# Altium PCB AirBnB-v1.0.PcbDoc (part 5 of 6)
Units mil, origin at the board's own origin, x right, y up, seen from the top; angles counter-clockwise.
Board outline 3937 x 3937 mil, 4 copper layers (Top Layer, Signal + GND, Signal + 3v3, Bottom Layer), stack 62.417 mil thick; 240 components, 168 nets, 829 pads, 395 vias.
Unrouted connection lines stored in the file: 6.
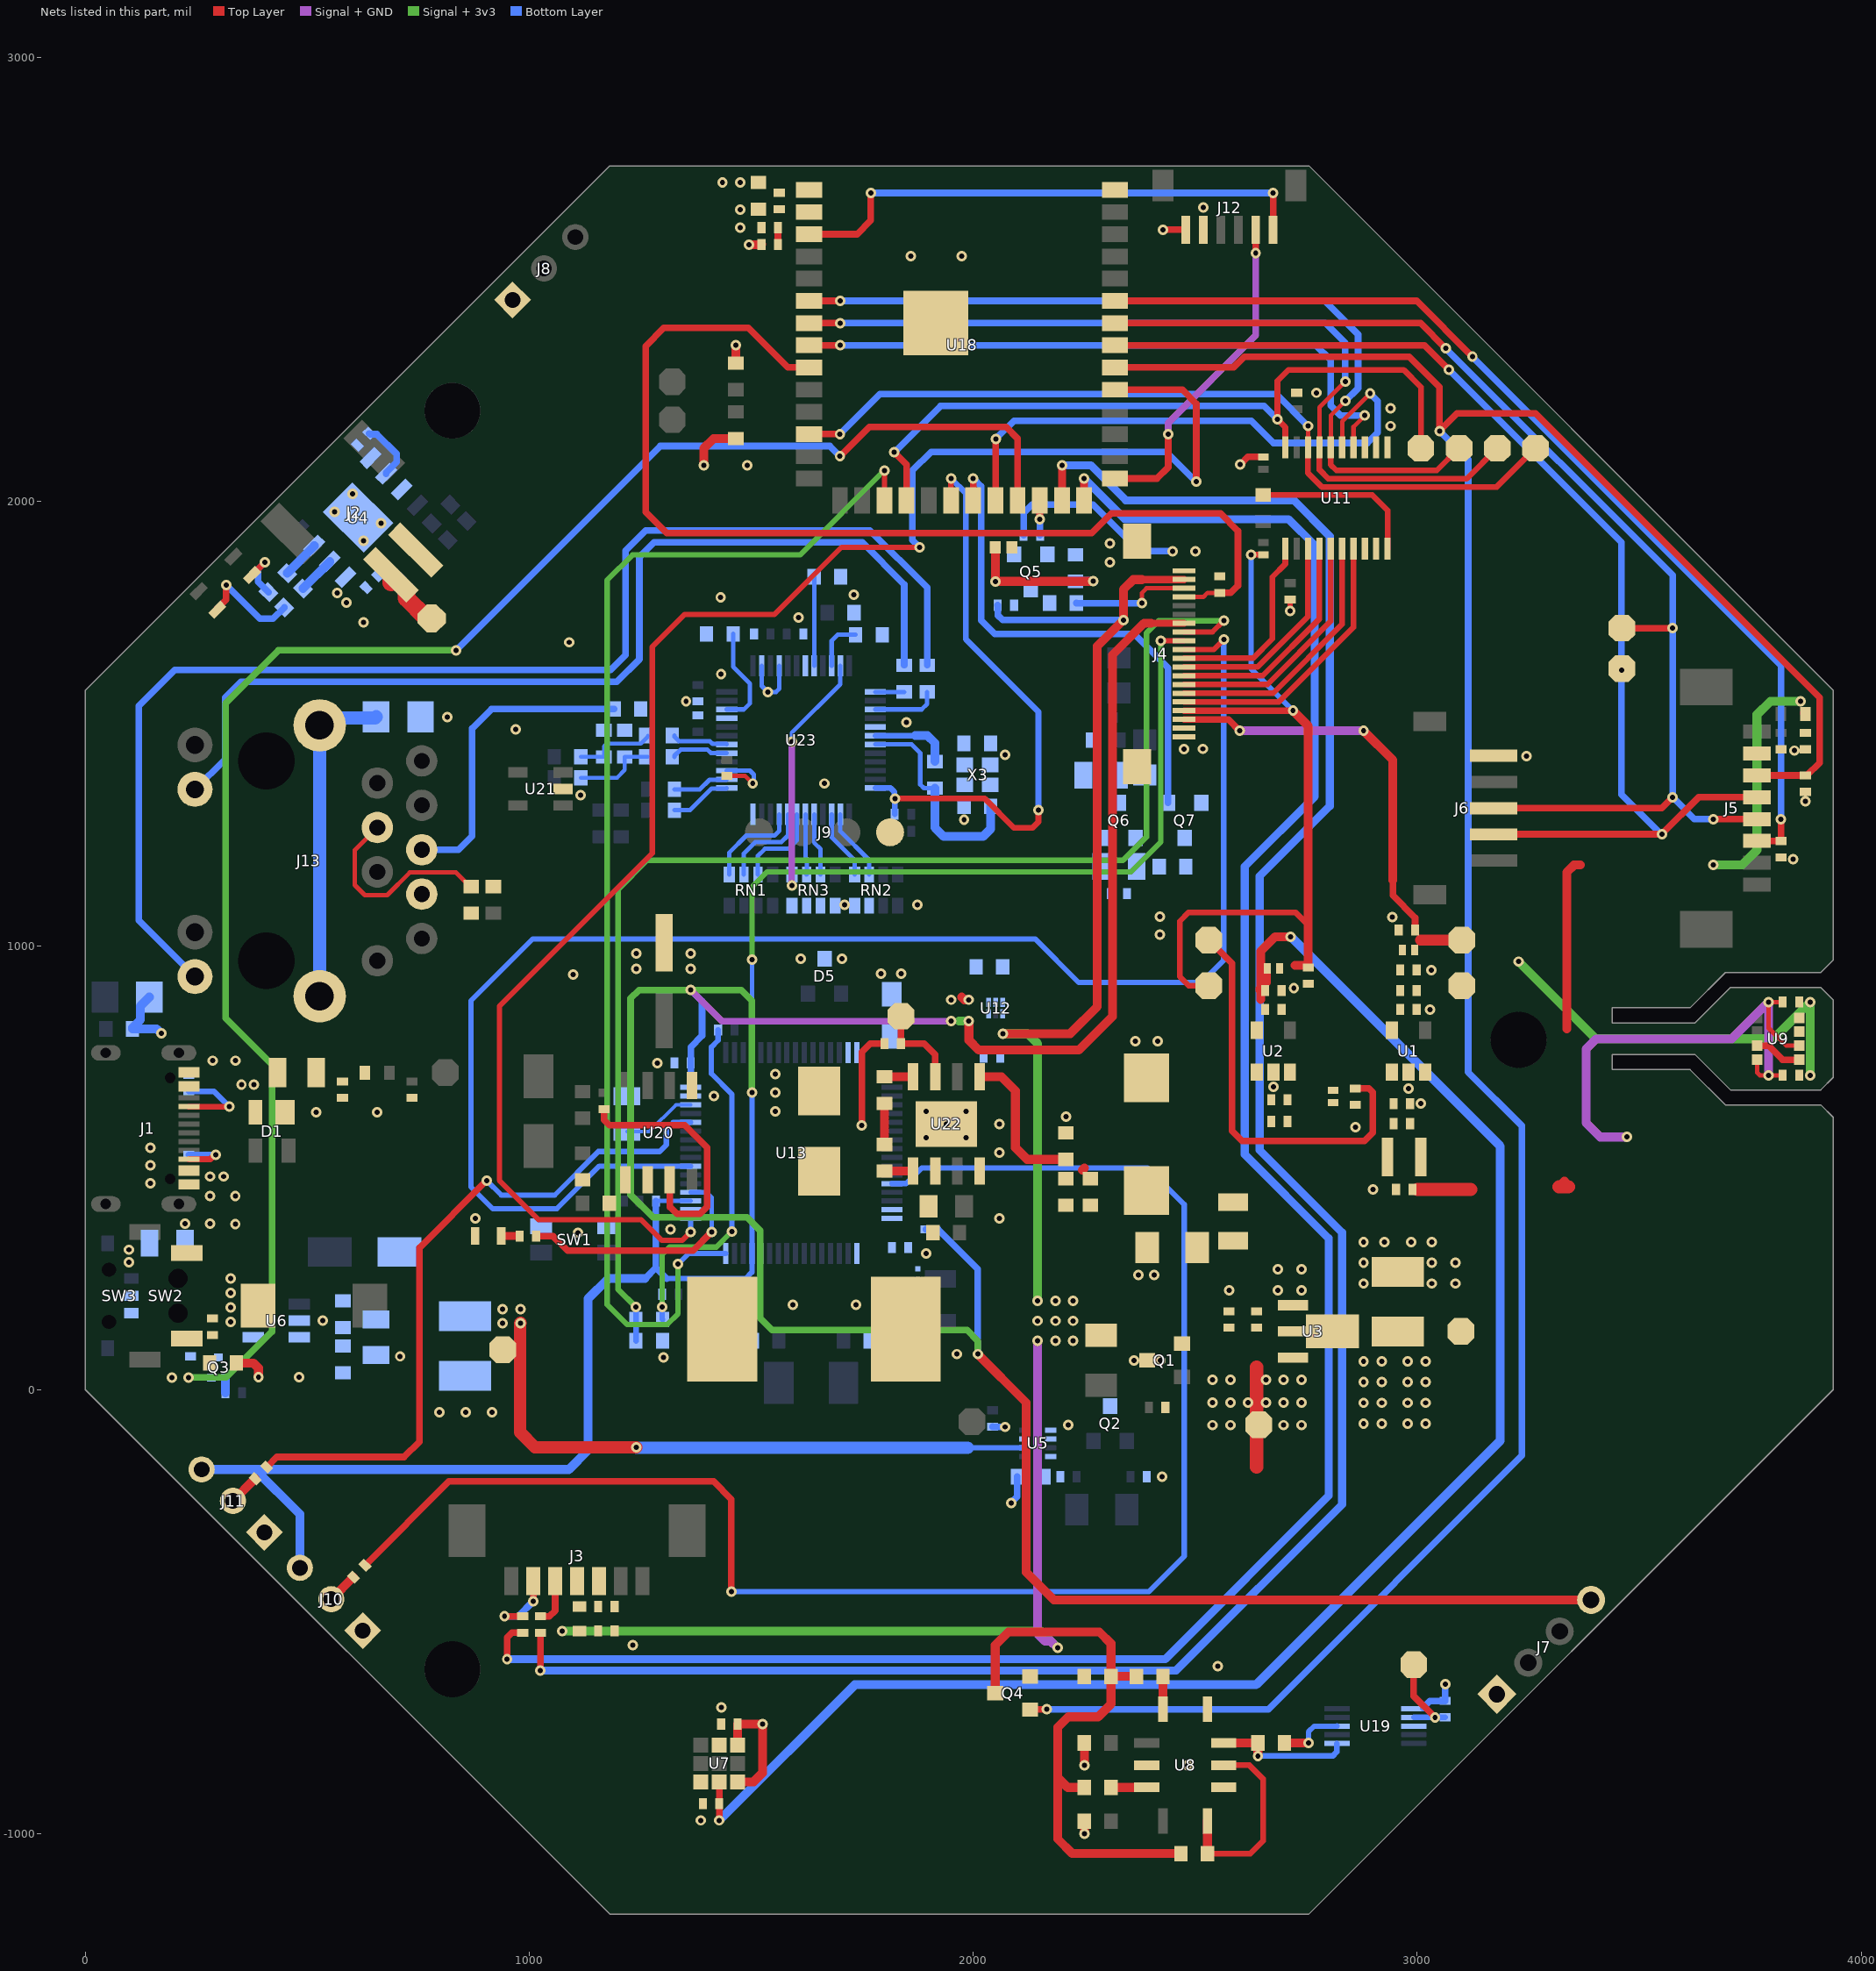
[diagram p4: the nets of this part, all layers, seen from the top]

## Via types
v1: diameter 23.62, hole 11.81, Top Layer to Bottom Layer, 392 vias
v2: diameter 23.62, hole 11.81, Top Layer to Bottom Layer, tented top, 3 vias

## Nets (pads, with @x,y where several pads share a name; then routed paths per layer and width w, separated by ;. In a path a pad name is that pad's centre, name@x,y a point inside that pad or via, vN(x,y) a via of type N, cw(c..) or ccw(c..) an arc to the next point about the centre after c; other vN are vias at no path point) (continued)
NetR64_2: R64.2 U23.2 | length 127
  Bottom Layer w10: R64.2@1327,1352 1384.14,1352 1405.66,1373.52 1443.78,1373.52 U23.2@1444.68,1374.42
NetR67_2: R67.2 U23.10 | length 230.1
  Bottom Layer w10: U23.10@1444.68,1531.9 1483.16,1531.9 1497,1545.74 1497,1589.9 1459,1627.9 R67.2@1459,1702
NetRN1_1: RN1.1 U23.45 | length 219.6
  Bottom Layer w10: RN1.1@1450,1160 1450,1209.16 1488.87,1248.03 1552.43,1248.03 1562.79,1258.39 U23.45@1562.79,1295.68
NetRN1_2: RN1.2 U23.44 | length 211.1
  Bottom Layer w10: RN1.2@1483.07,1160 1483.07,1207.15 1508.95,1233.03 1567.38,1233.03 1582.47,1248.12 U23.44@1582.47,1295.68
NetRN1_3: RN1.3 U23.43 | length 202.9
  Bottom Layer w10: RN1.3@1514.57,1160 1514.57,1202.04 1530.56,1218.03 1583.33,1218.03 1602.16,1236.86 U23.43@1602.16,1295.68
NetRN2_5: RN2.5 U23.39 | length 157
  Bottom Layer w10: U23.39@1680.9,1295.68 1680.9,1244.06 1732.36,1192.59 RN2.5@1732.36,1160
NetRN2_6: RN2.6 U23.38 | length 162.5
  Bottom Layer w10: U23.38@1700.58,1295.68 1700.58,1257.57 1765.43,1192.72 RN2.6@1765.43,1160
NetRN3_5: RN3.5 U23.23 | length 567.3
  Signal + GND w15: v1(1591.18,1135) 1591.18,1455.47 v1@1595.16,1459.46
  Bottom Layer w10: v1(1591.18,1135) RN3.5@1591.18,1160 ; v1(1591.18,1459.46) 1591.18,1479.41 1700.58,1588.81 U23.23@1700.58,1630.32
NetRN3_6: RN3.6 U23.42 | length 137.3
  Bottom Layer w10: U23.42@1621.84,1295.68 1621.84,1198.16 1625,1195 1625,1160.75 RN3.6@1624.25,1160
NetRN3_7: RN3.7 U23.41 | length 141.6
  Bottom Layer w10: U23.41@1641.53,1295.68 1641.53,1231.8 1655.75,1217.58 RN3.7@1655.75,1160